# Altium PCB BUCK_Switcing_Converter.PcbDoc
Units mil, origin at the board's own origin, x right, y up, seen from the top; angles counter-clockwise.
Board outline 6000 x 4000 mil, 2 copper layers (Top Layer, Bottom Layer); 34 components, 18 nets, 85 pads, 27 vias.
Unrouted connection lines stored in the file: 11.
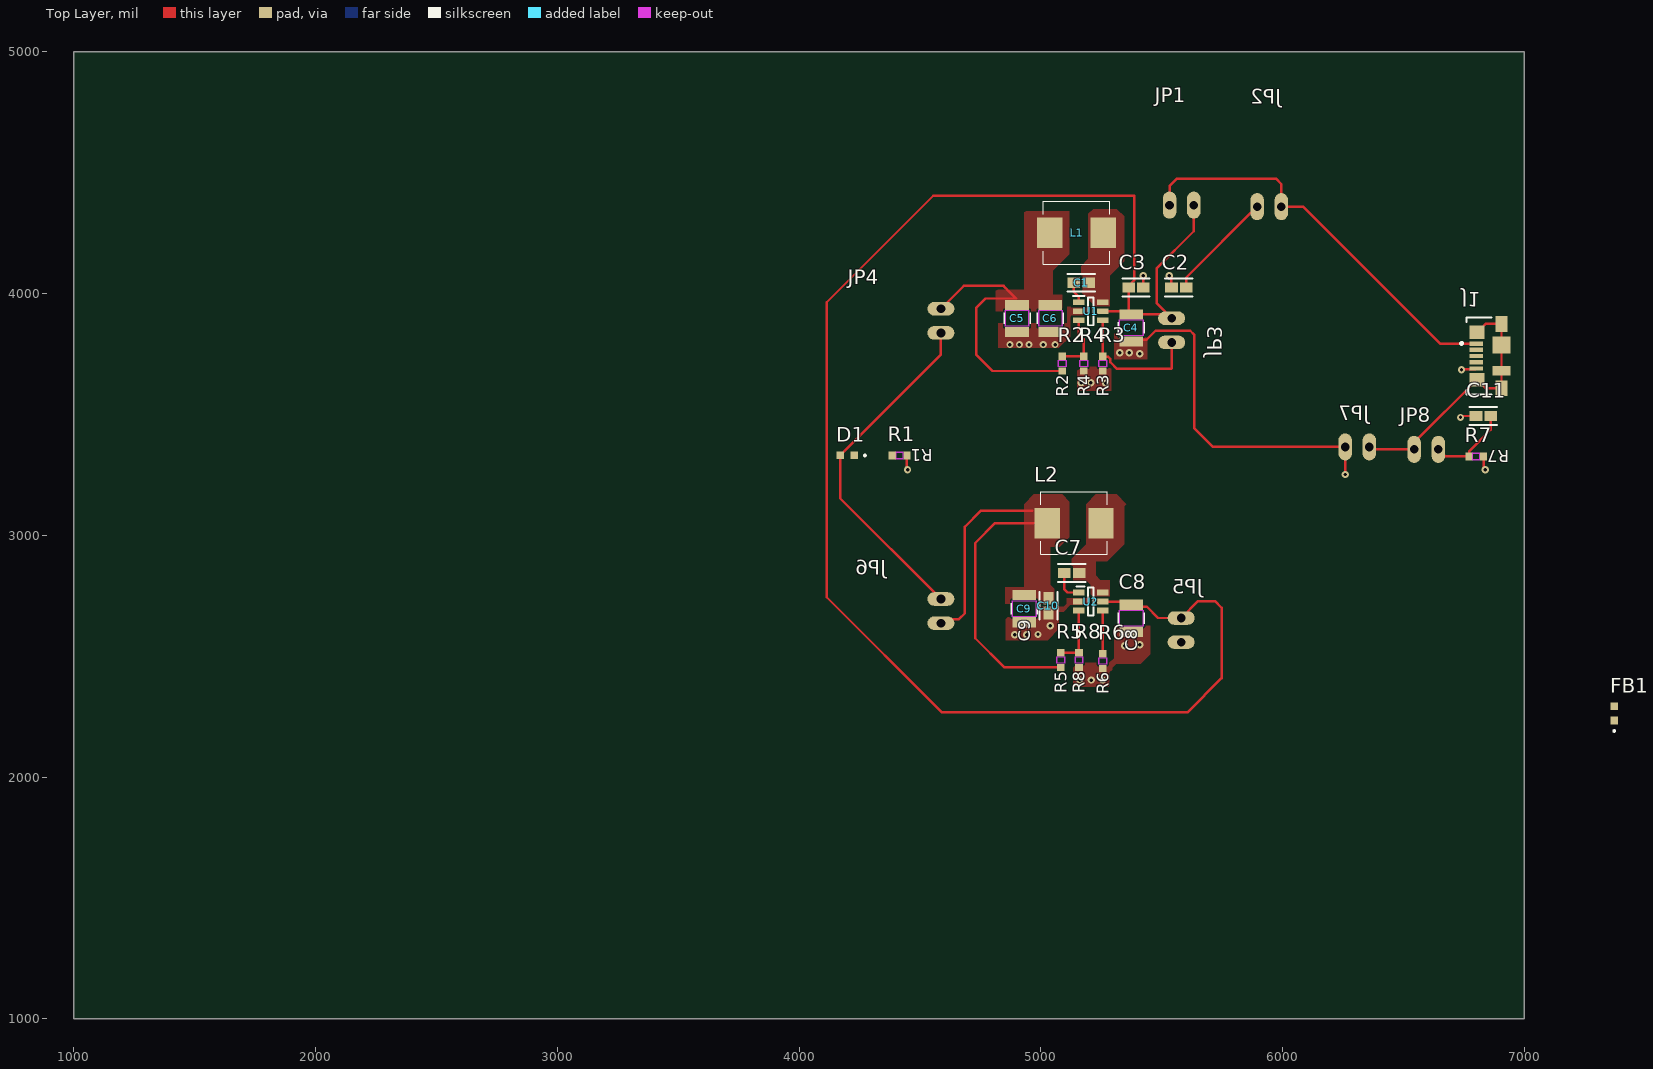
[diagram p0: Top Layer view]
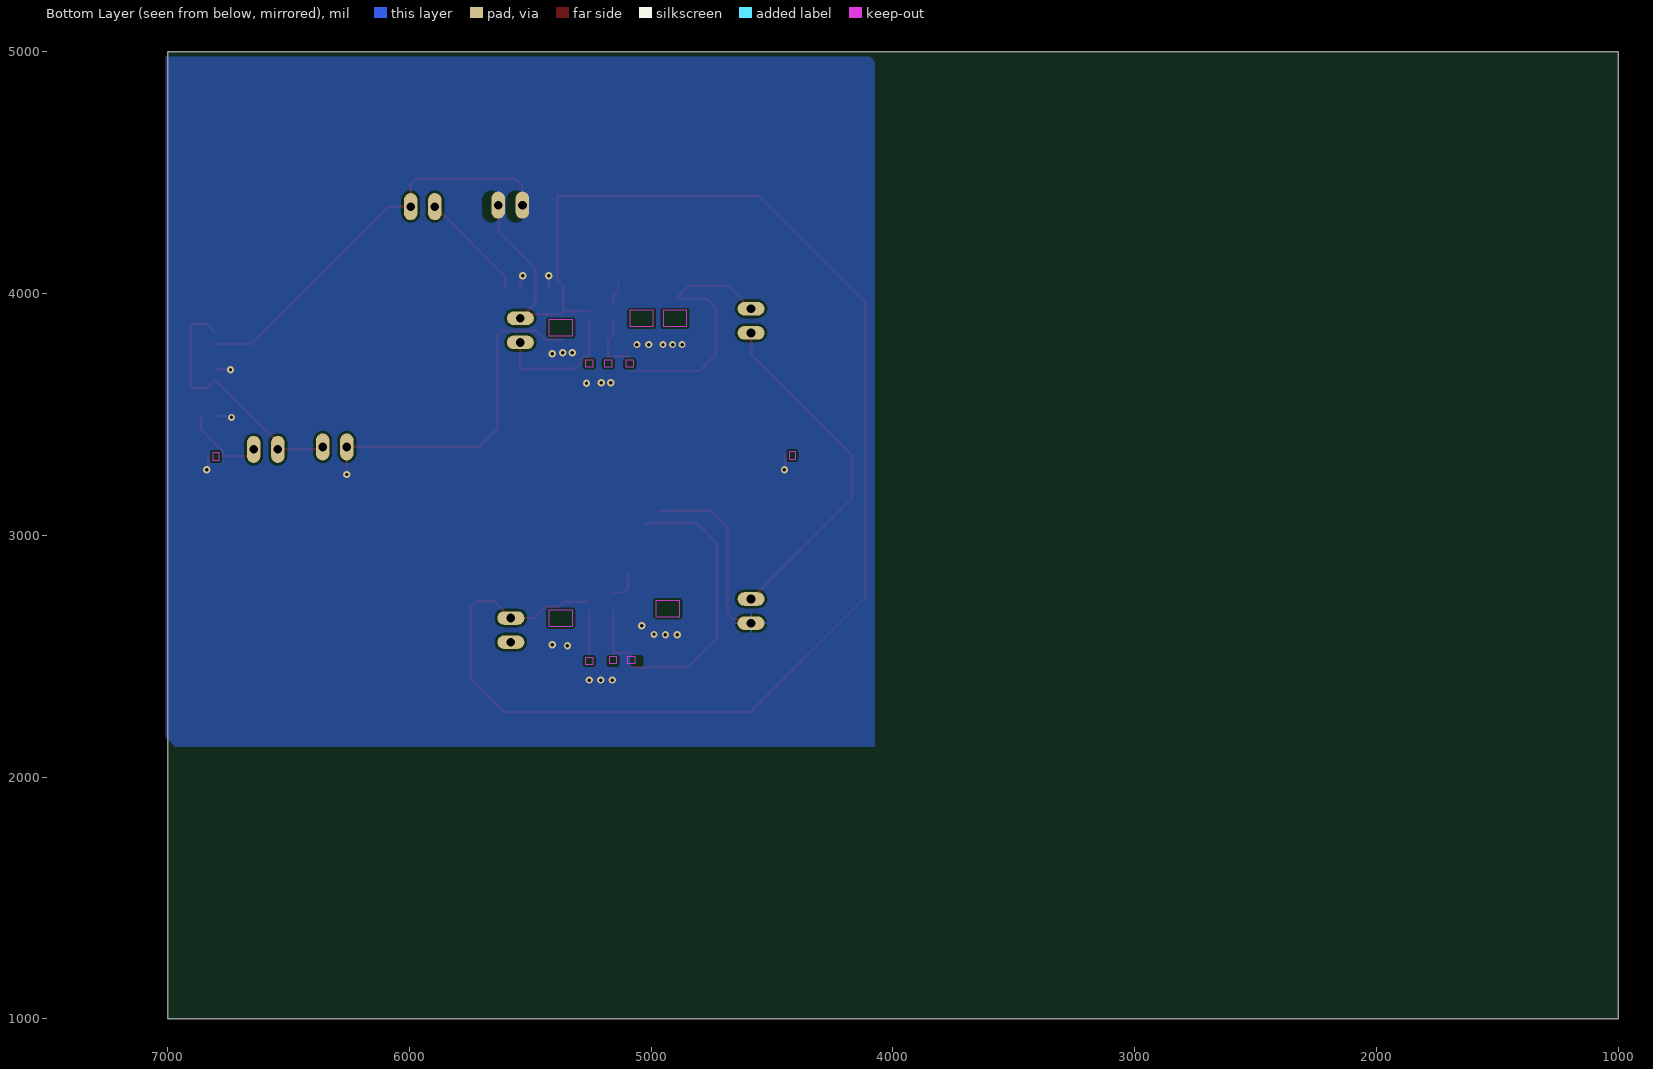
[diagram p1: Bottom Layer view, seen from below]
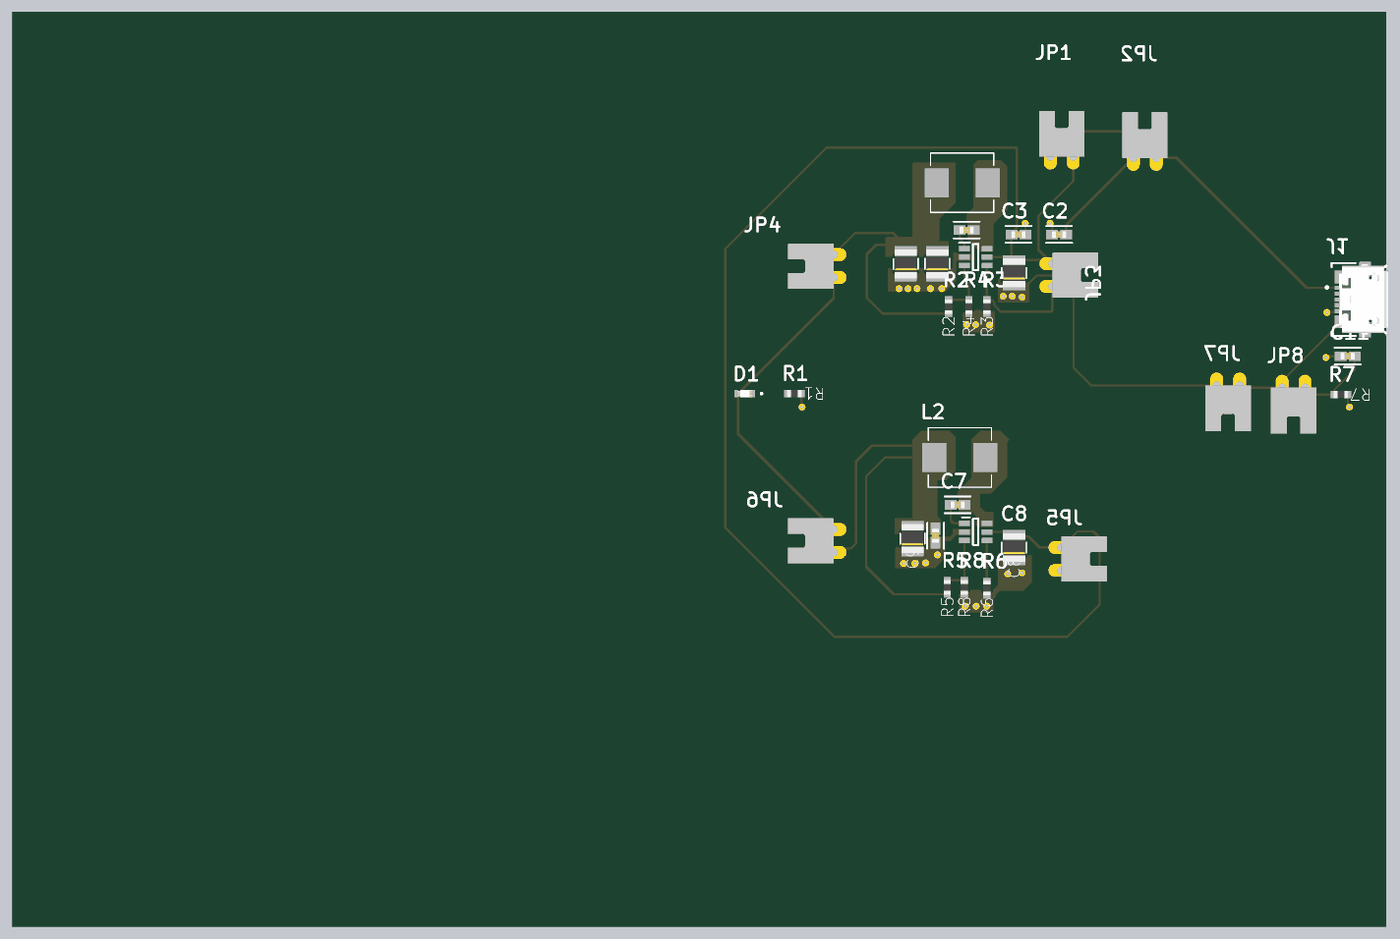
[diagram p2: 3D render of the assembled board from above, using the file's embedded part models]

## Layer stack, top to bottom
Top Solder: solder mask 0.4, Solder Resist, Dk 3.5
Top Layer: signal copper 1.4
Dielectric 1: dielectric 12.6, FR-4, Dk 4.8
Bottom Layer: signal copper 1.4
Bottom Solder: solder mask 0.4, Solder Resist, Dk 3.5

## Board outline
1000,1000 7000,1000 7000,5000 1000,5000

## Design rules (kind name [scope] priority, off if disabled: settings)
Clearance [All] p1: gap=10 ignorepadtopadclearanceinfootprint=FALSE
PolygonConnect [All] p1: connectstyle=Direct reliefconductorwidth=10 reliefentries=4 polygonreliefangle="90 Angle" airgapwidth=10
RoutingVias [All] p1: holewidth=28 width=50 viastyle="Through Hole" minholewidth=28 minwidth=50 maxholewidth=28 maxwidth=50
SolderMaskExpansion [All] p1: expansion=0 istentingtop=FALSE
SupplyNets "Schematic Supply Nets_5" [InNet('VBUS')] p1: voltage=0.000
SupplyNets "Schematic Supply Nets_4" [InNet('+3V3_BUCK2')] p2: voltage=0.000
SupplyNets "Schematic Supply Nets_3" [InNet('GND')] p3: voltage=0.000
SupplyNets "Schematic Supply Nets_2" [InNet('+5V')] p4: voltage=0.000
SupplyNets "Schematic Supply Nets_1" [InNet('+3V3')] p5: voltage=0.000
SupplyNets "Schematic Supply Nets" [InNet('+3V3_BUCK1')] p6: voltage=0.000
Width [All] p1: maxlimit=10 minlimit=10 preferedwidth=10
30 further rules are at their usual default settings.

## Components (designator, comment, footprint, x,y, rotation, side; value= is the part's Value field where it differs from the comment)
C1 "100n" FP-C0603X104K5RAC3316-IPC_A 5167.32,4045.28 r180 top
C2 "100n" FP-C0603X104K5RAC3316-IPC_A 5570.87,4025.59 r0 top
C3 "100n" FP-C0603X104K5RAC3316-IPC_A 5393.7,4025.59 r180 top
C4 "22u" G-32_MUR 5374.02,3858.27 r90 top
C5 "22u" G-32_MUR 4901.57,3897.64 r90 top
C6 "22u" G-32_MUR 5039.37,3897.64 r90 top
C7 "100n" FP-C0603X104K5RAC3316-IPC_A 5127.95,2844.49 r180 top
C8 "22u" G-32_MUR 5374.02,2657.48 r90 top
C9 "22u" G-32_MUR 4931.1,2696.85 r90 top
C10 "22u" FP-C0603X104K5RAC3316-IPC_A 5031.5,2709.62 r90 top
C11 "4n7" FP-C0603X104K5RAC3316-IPC_A 6830.71,3494.09 r0 top
D1 "GREEN" LED_SM0603UYC 4199.1,3330.93 r180 top
FB1 "120R" LED_SM0603UYC 7372.05,2263.78 r90 top
J1 "473460001" FP-473460001-MFG 6892.13,3742.13 r270 top
JP1 "Solder Jumper" FCI_68786-202LF 5582.68,4366.14 r0 top
JP2 "Solder Jumper" FCI_68786-202LF 5944.88,4360.24 r180 top
JP3 "Solder Jumper" FCI_68786-202LF 5541.34,3848.43 r90 top
JP4 "Solder Jumper" FCI_68786-202LF 4586.61,3887.8 r90 top
JP5 "Solder Jumper" FCI_68786-202LF 5580.71,2608.27 r90 top
JP6 "Solder Jumper" FCI_68786-202LF 4586.61,2687.01 r270 top
JP7 "Solder Jumper" FCI_68786-202LF 6309.06,3366.14 r0 top
JP8 "Solder Jumper" FCI_68786-202LF 6594.49,3356.3 r180 top
L1 "47u" INDM7066X300N 5147.64,4251.97 r180 top
L2 "47u" INDM7066X300N 5137.8,3051.18 r180 top
R1 "1k" RC0603N_YAG 4415.63,3330.93 r180 top
R2 "75k" RC0603N_YAG 5088.58,3710.63 r90 top
R3 "10k" RC0603N_YAG 5255.91,3710.63 r90 top
R4 "24k" RC0603N_YAG 5177.17,3710.63 r90 top
R5 "75k" RC0603N_YAG 5082.68,2484.25 r90 top
R6 "10k" RC0603N_YAG 5255.91,2480.32 r90 top
R7 "1M" RC0603N_YAG 6801.18,3326.77 r180 top
R8 "24k" RC0603N_YAG 5157.48,2484.25 r90 top
U1 "TP6841S6" SOT95P280X125-6N 5206.69,3927.17 r0 top
U2 "TP6841S6" SOT95P280X125-6N 5206.69,2726.38 r0 top

## Footprints (in the part's own frame and the unit in brackets; to place one, negate y for a bottom-side part, rotate by r counter-clockwise, add the part's x,y. Pads: shape width x height; smd on the part's side, far side on the other; paste and mask are expansions set on the pad)
FCI_68786-202LF [mil]
  oval 56x112 hole 36: 1(-50,0) 2(50,0)
  body extent -99,0 99,200, height 98
FP-473460001-MFG [mm]
  rect 0.45x1.38 smd paste+0 mask+0: 1(-1.3,-2.31) 2(-0.65,-2.31) 3(0,-2.31) 4(0.65,-2.31) 5(1.3,-2.31)
  rect 1.425x1.55 smd paste+0 mask+0: 6(-2.488,-2.225) 7(2.488,-2.225)
  rect 1.65x1.3 smd paste+0 mask+0: 8(-3.375,0.35) 11(3.375,0.35)
  rect 1.8x1.9 smd paste+0 mask+0: 9(-1.15,0.35)
  rect 1x1.9 smd paste+0 mask+0: 10(1.55,0.35)
  silkscreen extent -4.05,-3.97 4.05,-0.67, body extent -3.99,-2.5 3.99,2.93, height 2.98
FP-C0603X104K5RAC3316-IPC_A [mil]
  rect 52.2x41.66 smd paste+0 mask+0: 1(-30.54,0) 2(30.54,0)
  silkscreen extent -57,-37 57,37, body extent -76,-41 76,41, height 10
G-32_MUR [mil]
  rect 42x98 smd paste+0 mask+0: 1(-56,0) 2(56,0)
  Top Layer keep-out region: -33,-47 -33,47 33,47 33,-47
  Keep-Out Layer region: -33,-49 -33,49 33,49 33,-49
  silkscreen extent -23,-54 23,54, body extent -63,-49 63,49, height 110
INDM7066X300N [mm]
  rect 2.67x3.21 smd: 1(-2.82,0) 2(2.82,0)
  silkscreen extent -3.5,-3.3 3.5,3.3
LED_SM0603UYC [mm]
  rect 0.8x0.8 smd: A(0.75,0) C(-0.75,0)
  silkscreen extent -1.95,-0.1 -1.75,0.1, body extent -0.8,-0.4 0.8,0.4, height 0.6
RC0603N_YAG [mil]
  rect 29.78x32 smd paste+0 mask+0: 1(-30.39,0) 2(30.39,0)
  Top Layer keep-out region: -13.5,-14 -13.5,14 13.5,14 13.5,-14
  Keep-Out Layer region: -13.5,-16 -13.5,16 13.5,16 13.5,-16
  body extent -31,-16 31,16, height 28
SOT95P280X125-6N [mm]
  rect 1.2x0.6 smd: 1(-1.25,0.95) 2(-1.25,0) 3(-1.25,-0.95) 4(1.25,-0.95) 5(1.25,0) 6(1.25,0.95)
  silkscreen extent -1.85,-1.46 0.3,1.6

## Part data
C1 C2 C3 C7 C11: library part CAP_0603_50V, "Capacitor SMD 0603 50V"
C4 C5 C6 C8 C9 C10: library part CAP_1210_10V, "Capacitor SMD 1210 10V"
D1: library part LED_0402_GREEN, "LED 0402 GREEN SMD"
FB1: library part FB_0603, "Ferrite Bead SMD 0603"
J1: library part CMP-2000-05246-2, "CONN RCPT USB2.0 MICRO B SMD R/A", Current Rating=1.8A, Manufacturer=Molex, Package=0, Temperature="-30°C to +85°C", Temperature Range High=+85°C, Temperature Range Low=-30°C, Voltage Rating=30V, Automotive=No, Category=Conn, ComponentLink2Description=Datasheet, ComponentLink2URL=https://www.molex.com/webdocs/datasheets/pdf/en-us/0473460001_IO_CONNECTORS.pdf, Conn Orientation="Right Angle", Contact Material=Gold,Nickel, Device Class L1=Connectors, Device Class L2="USB Connectors", Device Class L3=unset, Digikey Description="CONN RCPT USB2.0 MICRO B SMD R/A", Footprint Url=https://www.molex.com/pdm_docs/sd/473460001_sd.pdf, Height=2.945mm, Is Female=yes, Lead Free=Yes, Manufacturer Part Number=473460001, Number Of Contacts=5, Octopart=https://octopart.com/47346-0001-molex-7164928, Pitch=0.65mm, RoHS=TRUE, Shielding=true, Usb Standard="USB 2.0"
JP1 JP2 JP3 JP4 JP5 JP6 JP7 JP8: library part SolderJumper_Single, "Solder Jumper Single 0.5mm Pitch"
L1 L2: library part MWSA0603S, "Power Inductor SMD Sunlord MWSA0603S", Manufacturer=Sunlord, Manufacturer Part Number=MWSA0603S-
R1 R2 R3 R4 R5 R6 R7 R8: library part RES_0603, "Resistor SMD 0603"
U1 U2: "40V 0.8A 800kHz Synchronous Step-Down Converter", Manufacturer="TECH PUBLIC", Manufacturer Part Number=TP6841S6

## Via types
v1: diameter 30, hole 14, Top Layer to Bottom Layer, 27 vias

## Nets (pads, with @x,y where several pads share a name; then routed paths per layer and width w, separated by ;. In a path a pad name is that pad's centre, name@x,y a point inside that pad or via, vN(x,y) a via of type N, cw(c..) or ccw(c..) an arc to the next point about the centre after c; other vN are vias at no path point)
+3V3: D1.A JP4.1 JP6.1 | length 1446.3
  Top Layer w10: JP6.1 4169.57,3154.05 D1.A 4586.61,3747.97 JP4.1
+3V3_BUCK1: C5.2 C6.2 JP4.2 L1.2 R2.1 | length 1130.6
  Top Layer w10: JP4.2 4681.1,4032.28 4845.67,4032.28 4897.64,3980.32 4771.65,3980.32 4732.28,3940.94 4732.28,3748.03 4800.07,3680.24 R2.1
+3V3_BUCK2: C9.2 C10.2 JP6.2 L2.2 R5.1 | length 1914
  Top Layer w10: JP6.2 4589.76,2633.86 4609.45,2653.54 4661.42,2653.54 4685.04,2677.17 4685.04,3035.43 4751.97,3102.36 4964.57,3102.36 ; L2.2 4811.02,3051.18 4728.35,2968.5 4728.35,2574.8 4849.29,2453.86 R5.1
+5V: C3.2 C4.2 C8.2 JP1.2 JP3.2 JP5.2 U1.5 U2.5 | length 6752.9
  Top Layer w10: U2.5 5361.12,2726.38 C8.2 5382.02,2705.48 5438.02,2705.48 5485.23,2658.27 JP5.2 5650.79,2728.35 5720.47,2728.35 5748.03,2700.79 5748.03,2409.45 5606.3,2267.72 4590.55,2267.72 4114.17,2744.09 4114.17,3964.57 4555.12,4405.51 5385.83,4405.51 5385.83,4055.32 5363.16,4032.66 C3.2 5363.16,3925.12 C4.2 ; U1.5 5361.12,3927.17 C4.2 ; JP3.2 JP3.2@5525.5,3914.27 ; JP1.2 5632.68,4258.66 5480.31,4106.3 5480.31,3959.45 JP3.2@5525.5,3914.27 ; C4.2 JP3.2@5525.5,3914.27
BUCK1_BST: C1.2 U1.1 | length 89.3
  Top Layer w10: C1.2 5136.78,4006.92 5157.48,3986.22 U1.1
BUCK1_EN: JP3.1 R3.2 U1.4 | length 573.2
  Top Layer w10: U1.4 R3.2 5255.91,3739.13 5278.12,3739.13 5286.91,3730.34 5286.91,3717.03 5315.22,3688.71 5539.11,3688.71 5541.34,3690.95 JP3.1
BUCK1_FB: R2.2 R4.2 U1.3 | length 247.4
  Top Layer w10: R2.2 R4.2 ; U1.3 5157.48,3830.71 5177.17,3811.02 R4.2@5177.17,3739.13
BUCK1_SW: C1.1 L1.1 U1.6
BUCK2_BST: C7.2 U2.1 | length 133.3
  Top Layer w10: C7.2 5097.41,2776.6 5110.24,2763.78 U2.1
BUCK2_EN: JP5.1 R6.2 U2.4 | length 213.9
  Top Layer w10: R6.2 U2.4 ; JP5.1@5545.1,2558.27 JP5.1
BUCK2_FB: R5.2 R8.2 U2.3 | length 249.1
  Top Layer w10: R5.2 R8.2 U2.3
BUCK2_SW: C7.1 L2.1 U2.6
GND: C2.1 C3.1 C4.1 C5.1 C6.1 C8.1 C9.1 C10.1 C11.1 J1.5 JP7.1 R1.1 R3.1 R4.1 R6.1 R7.1 R8.1 U1.2 U2.2 | length 1796.6
  Top Layer w10: R1.1 4446.02,3274.45 v1(4448.82,3271.65) ; C4.1@5372.05,3810.27 5438.02,3810.27 5474.2,3846.46 5618.11,3846.46 5633.86,3830.71 5633.86,3444.3 5712.02,3366.14 JP7.1 6259.06,3252.76 v1(6259.84,3251.97) ; v1(5423.23,4074.8) 5424.24,4073.79 C3.1 ; v1(5531.5,4074.8) 5540.33,4065.97 C2.1 ; v1(6736.22,3488.19) 6742.13,3494.09 C11.1 ; v1(6740.16,3685.04) 6742.36,3687.24 6797.48,3687.24 J1.5 ; R7.1 6831.57,3278.67 v1(6838.58,3271.65) v1@6838.58,3267.72
  other v1: 5161.42,2401.57 5208.66,2401.57 5255.91,2401.57 5346.46,2543.31 5409.45,2547.24 4891.73,2588.58 4940.94,2588.58 4988.19,2590.55 5039.37,2625.98 5267.72,3629.92 5167.32,3631.89 5206.69,3631.89 5409.45,3751.97 5326.77,3755.91 5366.14,3755.91 4872.05,3789.37 4911.42,3789.37 4950.79,3789.37 5009.84,3789.37 5059.06,3789.37
NetC2_2: C2.2 JP2.2 | length 456.2
  Top Layer w10: C2.2 5601.4,4066.76 JP2.2
NetC11_2: C11.2 JP8.1 R7.2 | length 343.3
  Top Layer w10: JP8.1 6674.02,3326.77 R7.2 6772.68,3328.66 6772.68,3348.98 6861.25,3437.55 C11.2
NetJ1_6: J1.6 J1.7 J1.8 J1.9 J1.10 J1.11 JP7.2 JP8.2 | length 1082.6
  Top Layer w10: JP7.2 6368.9,3356.3 JP8.2 6544.49,3384.15 J1.7 6839.47,3609.25 J1.11 J1.10 J1.9 J1.8 6839.47,3875 J1.6
PWR_LED_K: R1.2
VBUS: J1.1 JP1.1 JP2.1 | length 1698.8
  Top Layer w10: JP1.1 5532.68,4446.06 5562.99,4476.38 5972.44,4476.38 5994.88,4453.94 JP2.1 6084.65,4360.24 6651.57,3793.31 J1.1
pads on no net: D1.C FB1.A FB1.C J1.2 J1.3 J1.4

## Polygon pours and split planes (outlines as drawn)
+3V3_BUCK1 on Top Layer "+3V3_BUCK1_L01_P002" (solid, pour order 2): 4812.99,3927.17 5088.58,3927.17 5088.58,3996.06 5049.21,3996.06 5049.21,4094.49 5118.11,4163.39 5118.11,4183.07 5118.11,4340.55 4940.94,4340.55 4931.1,4350.39 4931.1,4015.75 4822.83,4015.75 4812.99,4025.59
GND on Top Layer "GND_L01_P014" (solid, pour order 14): 5303.15,3834.65 5440.94,3834.65 5440.94,3728.35 5290.25,3728.35 5290.25,3598.43 5149.61,3598.43 5149.61,3645.67 5149.61,3696.85 5303.15,3696.85
GND on Top Layer "GND_L01_P015" (solid, pour order 15): 5133.86,2472.44 5283.46,2472.44 5303.15,2492.13 5303.15,2625.98 5452.76,2625.98 5452.76,2507.87 5413.39,2468.5 5311.02,2468.5 5295.28,2452.76 5295.28,2444.88 5283.46,2433.07 5283.46,2377.95 5279.53,2374.02 5133.86,2374.02
GND on Top Layer "GND_L01_P013" (solid, pour order 13): 5003.94,2704.72 5094.49,2704.72 5106.3,2716.54 5106.3,2740.16 5192.91,2740.16 5192.91,2720.47 5185.04,2712.6 5122.05,2712.6 5094.49,2685.04 5074.8,2685.04 5074.8,2614.17 5027.56,2566.93 4854.33,2566.93 4854.33,2653.54 4881.89,2681.1 4984.25,2681.1 5003.94,2700.79
+3V3_BUCK2 on Top Layer "+3V3_BUCK2_L01_P004" (solid, pour order 4): 4852.36,2716.54 5055.12,2716.54 5055.12,2779.53 5039.37,2795.28 5039.37,2952.76 5078.74,2952.76 5118.11,2992.13 5118.11,3139.76 5088.58,3169.29 4970.47,3169.29 4931.1,3129.92 4931.1,2962.6 4931.1,2785.43 4852.36,2785.43
BUCK2_SW on Top Layer "BUCK2_SW_L01_P009" (solid, pour order 9): 5285.43,2746.06 5216.54,2746.06 5206.69,2755.91 5206.69,2795.28 5187.01,2814.96 5127.95,2814.96 5127.95,2903.54 5187.01,2962.6 5187.01,3129.92 5226.38,3169.29 5314.96,3169.29 5354.33,3129.92 5344.49,3120.08 5344.49,2962.6 5275.59,2893.7 5226.38,2893.7 5226.38,2834.65 5246.06,2814.96 5285.43,2814.96
GND on Top Layer "GND_L01_P011" (solid, pour order 11): 5187.01,3946.85 5108.27,3946.85 5108.27,3877.95 4822.83,3877.95 4822.83,3775.59 5074.8,3775.59 5122.05,3822.83 5122.05,3907.48 5187.01,3907.48
BUCK1_SW on Top Layer "BUCK1_SW_L01_P007" (solid, pour order 7): 5226.38,3946.85 5167.32,4005.91 5167.32,4114.17 5196.85,4143.7 5196.85,4330.71 5216.54,4350.39 5314.96,4350.39 5344.49,4320.87 5344.49,4133.86 5285.43,4074.8 5285.43,3946.85 5226.38,3946.85
+3V3_BUCK2 on Bottom Layer "+3V3_BUCK2_L02_P000" (solid, pour order 0): 4074.8,4960.63 4094.49,4980.31 7007.87,4980.31 7007.87,2165.35 6968.5,2125.98 4074.8,2125.98